# Altium PCB Kasli-DIOT.PCBDOC (part 9 of 23)
Units mm, origin at the board's own origin, x right, y up, seen from the top; angles counter-clockwise.
Board outline 222.9 x 100 mm, 10 copper layers (TopLayer, Layer 2, Layer 3, Layer 4, Layer 5, Layer 6, Layer 7, layer 8, Layer 9, BottomLayer), stack 1.564 mm thick; 977 components, 900 nets, 4676 pads, 2725 vias.
Unrouted connection lines stored in the file: 17.
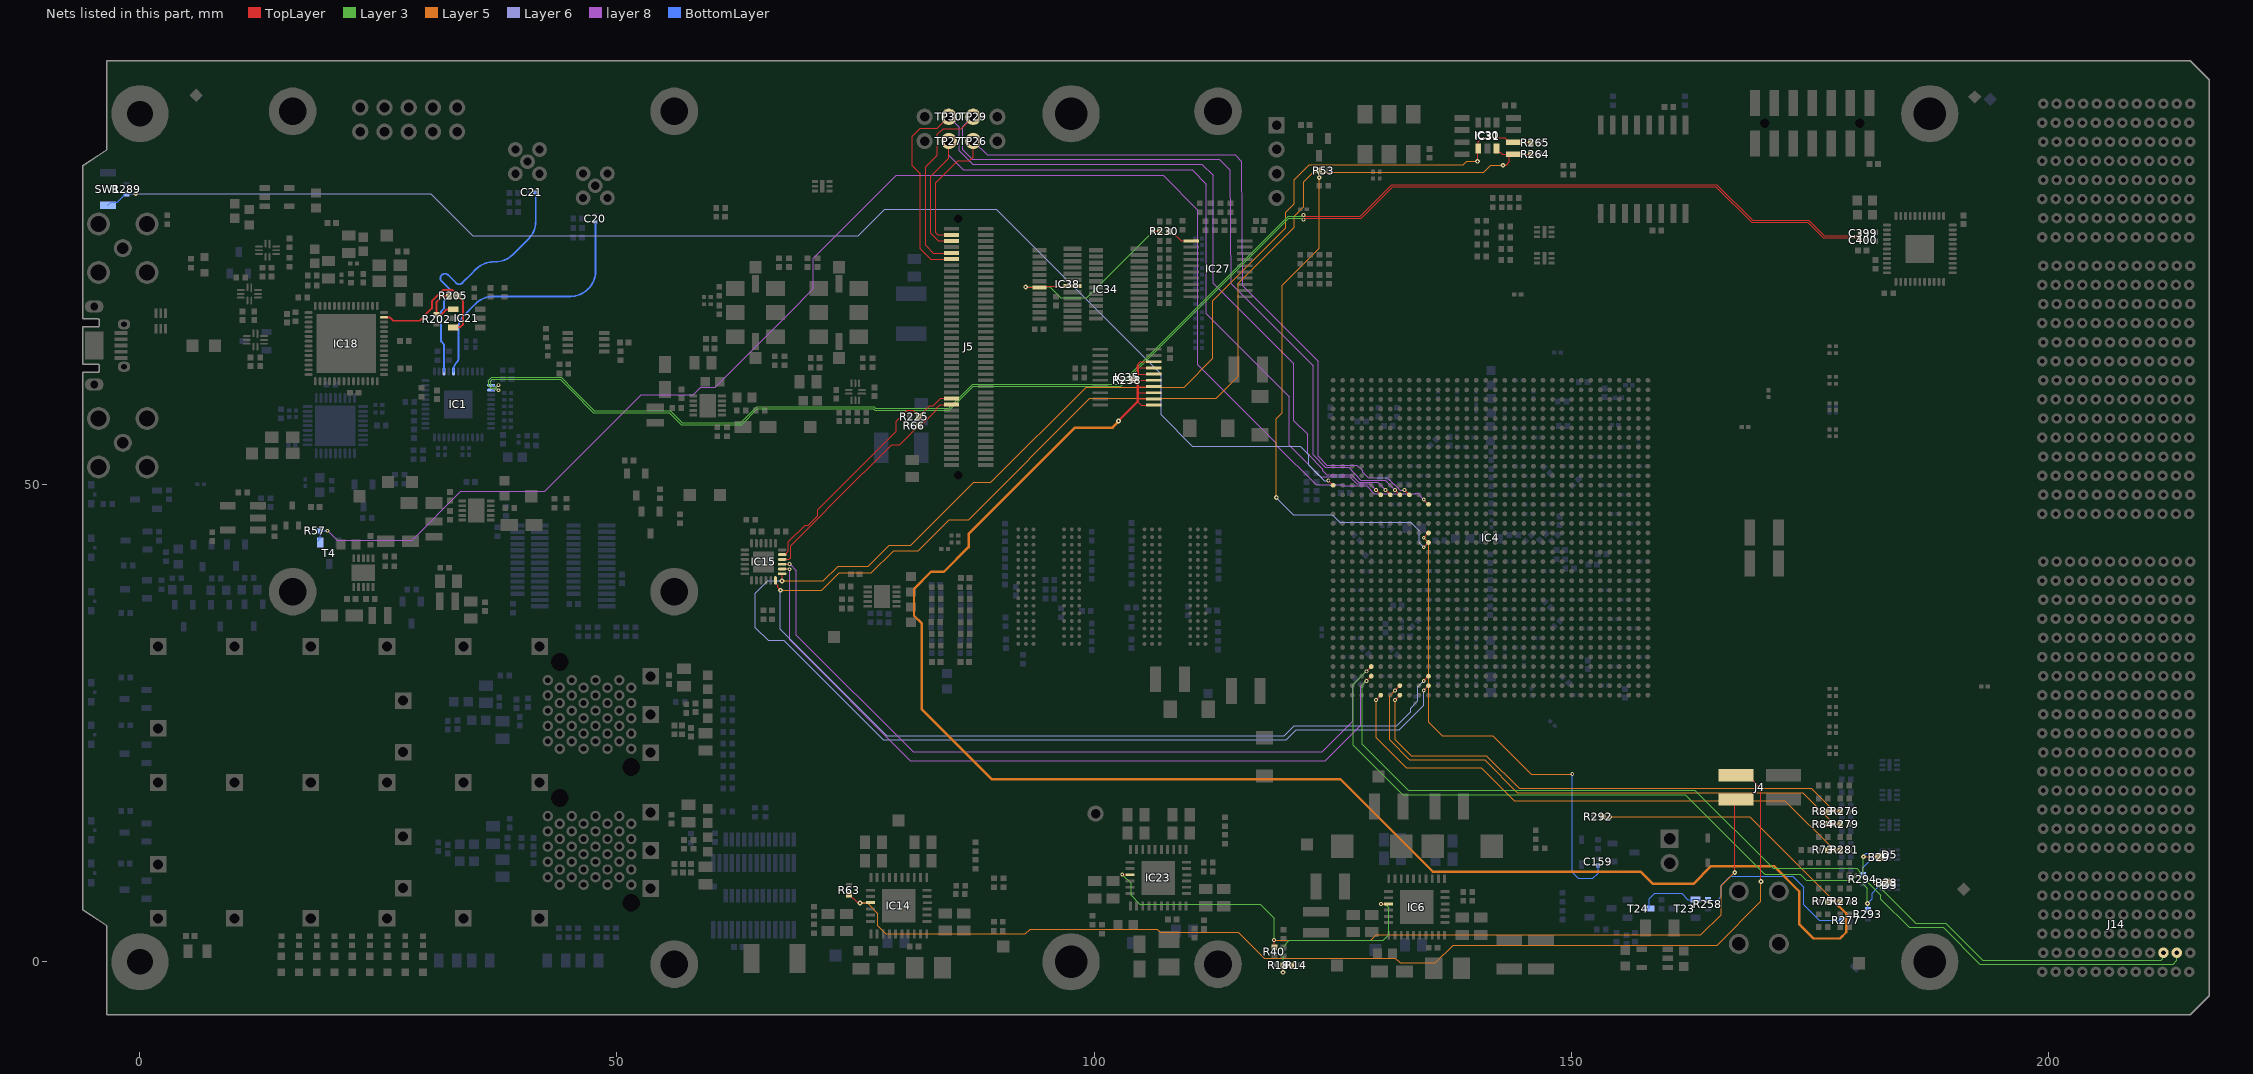
[diagram p15: the nets of this part, all layers, seen from the top]

## Via types
v1: diameter 0.4, hole 0.2, TopLayer to BottomLayer, tented both sides, 1723 vias
v2: diameter 0.5, hole 0.2, TopLayer to BottomLayer, tented both sides, 524 vias
v3: diameter 0.6, hole 0.3, TopLayer to BottomLayer, tented both sides, 172 vias
v4: diameter 0.6, hole 0.3, TopLayer to BottomLayer, 113 vias
v5: diameter 0.5, hole 0.2, TopLayer to BottomLayer, 107 vias
v6: diameter 0.4, hole 0.2, TopLayer to BottomLayer, 67 vias
v7: diameter 0.5, hole 0.25, TopLayer to BottomLayer, tented both sides, 12 vias
v8: diameter 0.8, hole 0.5, TopLayer to BottomLayer, tented both sides, 7 vias

## Nets (pads, with @x,y where several pads share a name; then routed paths per layer and width w, separated by ;. In a path a pad name is that pad's centre, name@x,y a point inside that pad or via, vN(x,y) a via of type N, cw(c..) or ccw(c..) an arc to the next point about the centre after c; other vN are vias at no path point) (continued)
Default_flash: IC4.M1 R289.1 SW1.1 | length 146.9
  TopLayer w0.095: v1(124.561,50.45) IC4.M1@125.061,49.95
  Layer 6 w0.127: v5(-0.449,80.53) -0.447,80.531 30.455,80.531 34.876,76.11 75.301,76.11 78.065,78.875 89.736,78.875 107.025,61.586 107.025,57.361 110.319,54.067 121.632,54.067 122.524,53.175 122.524,52.062 124.136,50.45 v1(124.561,50.45)
  BottomLayer w0.127: SW1.1@-3.364,79.3 -3.027,79.637 -2.373,79.637 -1.706,80.304 -1.646,80.304 -1.639,80.311 R289.1@-1.639,80.53 ; R289.1@-1.4,80.53 v5(-0.449,80.53)
DI: IC18.55 IC21.3 R205.2 | length 14.3
  TopLayer w0.2: IC18.55@25.576,67.558 26.186,67.558 26.544,67.2 29.311,67.2 30.592,68.481 30.592,69.231 31.791,70.43 32.718,70.43 33.331,69.817 R205.2@33.331,69.797 33.331,69.777 33.839,69.269 33.839,66.788 33.594,66.543 32.904,66.543 IC21.3@32.861,66.5
DIOT_BUS_CTRL.PRST_N: IC4.AP6 R73.1 R281.1 | length 58.9
  TopLayer w0.127: v1(129.561,27.45) IC4.AP6@130.061,27.95 ; R73.1@176.926,11.731 v2(177.581,11.731) R281.1@178.236,11.731
  Layer 5 w0.127: v1(129.561,27.45) 129.561,23.481 132.705,20.337 140.58,20.337 144.027,16.89 172.422,16.89 v2(177.581,11.731)
DIOT_BUS_CTRL.PS_ON_N: R258.1 R277.1 T23.1 T24.3 | length 26.4
  BottomLayer w0.127: T24.3@158.219,5.575 158.219,6.597 158.796,7.175 161.611,7.175 162.261,6.525 T23.1@163.061,6.525 164.294,6.525 R258.1@164.341,6.478 165.389,6.478 165.773,6.862 165.773,8.034 166.7,8.962 173.246,8.962 174.379,7.828 174.379,6.006 176.035,4.35 R277.1@178.391,4.35
DIOT_BUS_CTRL.PWR_FAIL_N: IC4.AN8 R84.1 R279.1 | length 57.7
  TopLayer w0.127: v1(131.561,28.45) IC4.AN8@132.061,28.95 ; R84.1@176.926,14.428 v2(177.581,14.428) R279.1@178.236,14.428
  Layer 5 w0.127: v1(131.561,28.45) 130.986,27.875 130.986,24.95 130.986,23.263 133.058,21.191 140.933,21.191 144.38,17.744 174.265,17.744 v2(177.581,14.428)
DIOT_BUS_CTRL.PWRBTN_N: IC4.AP8 R83.1 R276.1 | length 55.3
  TopLayer w0.127: v1(131.561,27.45) IC4.AP8@132.061,27.95 ; R83.1@176.926,15.776 176.93,15.772 v2(177.581,15.772) ; v2@177.581,15.776 R276.1@178.236,15.776
  Layer 5 w0.127: v1(131.561,27.45) 131.561,23.292 133.235,21.618 141.11,21.618 144.557,18.171 175.186,18.171 177.581,15.776 v2(177.581,15.772)
DIOT_BUS_CTRL.RST_N: IC35.11 IC35.12 IC35.13 IC35.14 IC35.15 IC35.16 IC35.17 IC35.18 R75.1 R238.2 R278.1 R292.2 | length 208.7
  TopLayer w0.127: 104.573,58.713 104.932,58.354 IC35.11@106.411,58.354 ; 104.573,58.938 104.64,59.004 IC35.12@106.411,59.004 ; 104.573,59.677 104.597,59.654 IC35.13@106.411,59.654 ; 104.573,60.304 IC35.14@106.411,60.304 ; 104.573,60.965 104.585,60.954 IC35.15@106.411,60.954 ; 104.573,61.683 104.653,61.604 IC35.16@106.411,61.604 ; 104.573,62.254 IC35.17@106.411,62.254 ; 104.573,62.445 104.573,62.622 104.855,62.904 IC35.18@106.411,62.904 ; R292.2@153.302,15.206 153.325,15.182 v2(154.061,15.182) ; R75.1@176.926,6.338 v2(177.581,6.338) R278.1@178.236,6.338
  TopLayer w0.254: v2(102.573,56.691) 102.573,56.712 104.573,58.713 104.573,58.938 104.573,59.677 104.573,60.304 104.573,60.965 ; R238.2@103.978,60.965 104.573,60.965 ; 104.573,62.445 104.573,62.254 104.573,61.683 104.573,60.965
  Layer 5 w0.127: v2@154.065,15.186 168.733,15.186 v2(177.581,6.338)
  Layer 5 w0.254: v2(102.573,56.691) 102.573,56.624 102.167,56.218 102.167,56.212 101.954,56 98.011,56 86.855,44.844 86.855,43.469 84.27,40.884 82.925,40.884 81.134,39.093 81.134,36.277 81.961,35.45 81.961,26.45 89.261,19.15 125.811,19.15 135.511,9.45 157.302,9.45 158.582,8.17 162.82,8.17 164.684,10.034 171.278,10.034 173.909,7.403 173.909,3.947 175.411,2.444 178.194,2.444 178.85,3.1 178.85,5.069 v2(177.581,6.338)
DIOT_CLK_IN_0.CLK_N: C400.1 IC1.35 | length 160.8
  TopLayer w0.095: v6(121.961,77.789) 122.1,77.928 127.989,77.928 131.315,81.254 165.195,81.254 168.95,77.5 174.825,77.5 176.435,75.89 179.688,75.89 179.689,75.889 180.053,75.889 180.109,75.833 180.109,75.803 180.261,75.65 C400.1@180.286,75.65
  Layer 3 w0.075: v1(37.586,60.441) 37.542,60.441 37.38,60.279 36.961,60.279 36.749,60.491 36.749,60.863 36.936,61.05 44.05,61.05 45.284,59.816 47.527,57.573 55.477,57.573 56.691,56.359 56.75,56.3 63.061,56.3 64.723,57.963 76.872,57.963 77.011,57.823 84.845,57.823 87.362,60.34 102.826,60.34 120.424,77.938 121.755,77.938 121.904,77.789 v6(121.961,77.789)
  BottomLayer w0.095: IC1.35@36.811,60.428 37.105,60.428 37.244,60.289 37.378,60.289 37.53,60.441 v1(37.586,60.441)
DIOT_CLK_IN_0.CLK_P: C399.1 IC1.36 | length 161.4
  TopLayer w0.095: v6(121.961,78.289) 122.1,78.15 127.897,78.15 131.223,81.476 165.287,81.476 169.042,77.722 174.917,77.722 176.527,76.112 179.78,76.112 179.781,76.111 180.053,76.111 180.109,76.167 180.109,76.198 180.261,76.35 C399.1@180.286,76.35
  Layer 3 w0.075: v1(37.586,59.915) 37.542,59.915 37.38,60.077 36.877,60.077 36.547,60.407 36.547,60.947 36.852,61.252 44.134,61.252 45.486,59.9 47.611,57.775 55.561,57.775 56.193,57.143 56.834,56.502 62.977,56.502 64.64,58.165 76.955,58.165 77.095,58.025 84.761,58.025 87.278,60.542 102.742,60.542 120.34,78.14 121.755,78.14 121.904,78.289 v6(121.961,78.289)
  BottomLayer w0.095: IC1.36@36.811,59.928 37.105,59.928 37.244,60.067 37.378,60.067 37.53,59.915 v1(37.586,59.915)
DIOT_I2C.SCL: B29.1 D5.5 IC4.AL5 IC15.15 J14.B2 R294.1 | length 194.7
  TopLayer w0.1: IC15.15@67.311,41.679 68.058,41.679 v1(68.085,41.706) ; v2(180.654,11.011) 182.285,11.011 B29.1@182.321,10.975
  TopLayer w0.127: v1(128.561,30.45) IC4.AL5@129.061,30.95
  Layer 3 w0.1: v1(128.561,30.45) 127.184,29.073 127.184,22.7 132.359,17.525 161.961,17.525 170.312,9.174 174.013,9.174 174.642,8.545 179.403,8.545 v1(179.892,9.034) ; v2(180.654,11.011) 180.654,8.807 182.461,7 182.461,6.575 185.439,3.598 189.005,3.598 192.849,-0.246 213.111,-0.246 213.5,0.143 J14.B2@213.5,0.95
  layer 8 w0.1: v1(68.085,41.706) 68.786,41.006 68.786,34.25 81.038,21.998 123.922,21.998 127.126,25.202 127.126,29.015 v1(128.561,30.45)
  BottomLayer w0.1: R294.1@180.388,9.103 R294.1@180.586,9.103
  BottomLayer w0.125: v1(179.892,9.034) 179.894,9.032 180.339,9.032 180.388,9.081 R294.1@180.388,9.103 ; R294.1@180.586,9.103 180.586,9.861 181.775,11.05 182.302,11.05 D5.5@182.461,11.209 ; v2(180.654,11.011) 180.654,11.103 180.946,11.396 182.26,11.396 182.36,11.296 182.374,11.296 D5.5@182.461,11.209 ; D5.5@182.461,11.195 D5.5@182.461,11.209
DIOT_I2C.SDA: B28.1 D3.5 IC4.AM5 IC15.14 J14.C2 R293.1 | length 188
  TopLayer w0.1: IC15.14@67.311,41.179 68.057,41.179 v1(68.085,41.15)
  TopLayer w0.125: v2(181.914,8.276) 183.081,8.276 B28.1@183.148,8.343
  TopLayer w0.127: v1(128.561,29.45) IC4.AM5@129.061,29.95
  Layer 3 w0.1: v1(128.561,29.45) 128.12,29.009 128.12,22.816 132.936,18 162.986,18 171.186,9.8 179.95,9.8 180.343,9.407 180.343,8.448 181.075,7.716 v2(181.075,6.125) ; 189.258,4.052 193.16,0.15 211.868,0.15 212.026,0.309 212.026,0.877 J14.C2@212.1,0.95
  Layer 3 w0.125: v2(181.914,8.276) 186.138,4.052 189.258,4.052
  layer 8 w0.1: v1(68.085,41.15) 68.085,33.763 80.761,21.087 124.258,21.087 127.981,24.811 127.981,28.87 v1(128.561,29.45)
  BottomLayer w0.125: v2(181.075,6.125) 181.558,6.608 181.558,7.187 182.333,7.963 182.539,7.963 D3.5@182.626,8.05 ; R293.1@181.111,5.459 v2@181.111,6.107 ; v2(181.914,8.276) 181.953,8.237 182.26,8.237 182.36,8.137 D3.5@182.374,8.137
DIR: IC27.1 R230.2 | length 2.6
  TopLayer w0.127: R230.2@107.853,76.57 107.995,76.429 108.259,76.429 109.128,75.561 IC27.1@110.047,75.561
DIRb: IC34.7 IC38.19 R230.1 | length 22.4
  TopLayer w0.127: v2(92.834,70.734) 92.856,70.713 94.27,70.713 IC38.19@94.297,70.686 94.41,70.798 97.71,70.798 IC34.7@97.747,70.836 ; v2(106.216,76.57) R230.1@106.913,76.57
  Layer 3 w0.127: v2(92.834,70.734) 95.381,70.734 96.512,69.602 99.248,69.602 v2(106.216,76.57)
DO: IC21.1 R202.1 R205.1 | length 4.9
  TopLayer w0.2: R205.1@32.391,69.797 31.695,69.797 31.086,69.188 R202.1@31.086,67.845 31.602,67.845 32.128,68.371 32.832,68.371 IC21.1@32.861,68.4
EEM_CLK_OUT0: C20.1 IC1.27 | length 27.4
  BottomLayer w0.19: IC1.27@32.861,61.878 32.861,62.005 cw(c34.056,62.005) 33.211,62.85 ccw(c32.789,63.272) 33.386,63.272 33.386,66.468 cw(c35.093,66.468) 33.885,67.674 ; 33.886,67.675 35.217,69.006 cw(c37.013,67.21) 37.013,69.75 45.134,69.75 ccw(c45.134,72.29) 46.93,70.494 47.017,70.581 ccw(c45.221,72.377) 47.761,72.377 47.761,77.525 C20.1@47.736,77.55
EEM_CLK_OUT1: C21.1 IC1.25 | length 27.5
  BottomLayer w0.19: IC1.25@31.861,61.878 31.861,64.732 31.566,65.027 31.566,68.188 31.861,68.483 31.861,69.225 32.386,69.75 32.453,69.817 ccw(c32.117,70.154) 32.453,70.49 31.624,71.319 cw(c31.961,71.656) 31.624,71.992 cw(c31.961,71.656) 32.298,71.992 33.126,71.164 ccw(c33.463,71.5) 33.8,71.164 34.736,72.1 35.267,72.631 cw(c37.063,70.835) 37.063,73.375 37.259,73.375 ccw(c37.259,75.915) 39.055,74.119 40.742,75.806 ccw(c38.946,77.602) 41.486,77.602 41.486,80.6 C21.1@41.436,80.65
EEPROM_SCL: IC4.AN11 IC15.13 IC30.1 IC31.6 R265.1 | length 191.5
  TopLayer w0.095: v2(67.288,39.925) 67.311,39.948 IC15.13@67.311,40.679
  TopLayer w0.125: v2(140.203,83.904) 140.203,85.192 IC30.1@140.286,85.275 140.286,85.95 140.697,86.361 143.04,86.361 143.486,85.915 IC31.6@143.961,85.915 145.726,85.915 R265.1@145.791,85.85
  TopLayer w0.127: v1(134.561,28.45) IC4.AN11@135.061,28.95
  Layer 5 w0.095: v2(67.288,39.925) 71.639,39.925 73.189,41.475 76.353,41.475 78.551,43.674 80.801,43.674 87.377,50.25 89.161,50.25 99.161,60.25 109.461,60.25 112.461,63.25 112.461,69.295 120.104,76.938 120.104,78.593 120.985,79.474 120.985,81.95 122.575,83.54 138.714,83.54 139.078,83.904 v2(140.203,83.904)
  Layer 6 w0.127: v2(67.288,39.925) 65.785,39.925 64.486,38.626 64.486,35.035 65.84,33.68 67.491,33.68 77.897,23.275 120.129,23.275 121.185,24.331 132.001,24.331 134.561,26.891 v1(134.561,28.45)
EEPROM_SDA: IC4.AM11 IC15.12 IC30.3 IC31.5 R264.1 | length 189
  TopLayer w0.095: IC15.12@66.611,39.979 66.611,39.679 66.827,39.463 66.827,39.259 v2(67.136,38.95)
  TopLayer w0.125: IC30.3@142.186,85.098 142.423,84.861 142.6,84.861 142.816,84.645 143.784,84.645 143.547,84.408 143.547,83.855 143.211,83.519 142.88,83.519 v2(142.861,83.5) ; IC31.5@143.961,84.645 145.786,84.645 R264.1@145.791,84.65
  TopLayer w0.127: v1(134.561,29.45) IC4.AM11@135.061,29.95
  Layer 5 w0.095: v2(67.136,38.95) 71.464,38.95 73.289,40.775 76.671,40.775 78.995,43.099 81.571,43.099 84.816,46.344 86.855,46.344 99.561,59.05 112.792,59.05 115.111,61.369 115.111,71.114 120.985,76.988 120.985,78.174 121.961,79.15 121.961,81.75 122.961,82.75 140.861,82.75 141.611,83.5 v2(142.861,83.5)
  Layer 6 w0.127: v2(67.136,38.95) 67.136,34.842 78.274,23.704 119.951,23.704 121.007,24.76 131.746,24.76 133.197,26.212 133.197,26.601 133.936,27.339 133.936,28.825 v1(134.561,29.45)
EN1: IC6.19 R14.1 R18.2 | length 20.5
  TopLayer w0.127: v2(119.812,-1.099) 119.812,-0.419 R18.2@119.856,-0.375 120.716,-0.375 R14.1@120.741,-0.35 ; v1(130.086,6.05) 130.103,6.067 IC6.19@130.861,6.067
  Layer 3 w0.127: v2(119.812,-1.099) 119.812,1.597 120.49,2.275 130.336,2.275 130.911,2.85 130.911,5.675 130.536,6.05 v1(130.086,6.05)
EN2: IC23.19 J4.3 R40.1 | length 83.2
  TopLayer w0.127: v6(102.961,9.15) 102.973,9.138 103.761,9.138 IC23.19@103.774,9.125 ; v6(118.875,2.277) 118.902,2.25 118.902,1.525 R40.1@118.915,1.512 ; v2(167.161,9.375) 167.161,16.873 J4.3@167.308,17.02
  Layer 3 w0.127: v6(102.961,9.15) 103.886,8.225 103.886,6.975 104.811,6.05 117.411,6.05 118.875,4.586 v6(118.875,2.277)
  Layer 5 w0.127: v6(118.875,2.277) 118.889,2.263 128.988,2.263 129.561,2.836 163.621,2.836 165.738,4.954 165.738,7.952 v2(167.161,9.375)
EN3: IC14.19 J4.1 R63.1 | length 118.5
  TopLayer w0.127: R63.1@74.336,7.055 74.356,7.055 75.165,6.246 75.39,6.246 v2(75.461,6.175) 75.474,6.188 76.561,6.188 IC14.19@76.573,6.2 ; J4.1@167.308,19.56 168.513,19.56 169.908,18.164 v2(169.908,8.414)
  Layer 5 w0.127: v2(75.461,6.175) 76.22,6.175 77.336,5.059 77.336,3.764 78.17,2.931 92.806,2.931 93.299,3.424 106.618,3.424 106.942,3.1 115.136,3.1 117.859,0.377 131.578,0.377 132.077,-0.123 135.788,-0.123 137.661,1.75 165.321,1.75 169.908,6.338 v2(169.908,8.414)
EXT_SCL: IC15.17 J5.58 R225.1 | length 26.6
  TopLayer w0.125: IC15.17@67.311,42.679 67.611,42.679 67.973,43.041 67.973,44.028 69.723,45.778 70.051,45.778 71.036,46.762 71.036,47.387 72.643,48.995 72.648,48.995 79.28,55.626 79.28,56.663 80.427,57.809 80.982,57.809 R225.1@81.631,57.16 ; R225.1@81.631,57.14 R225.1@81.631,57.16 ; J5.58@85.061,59.053 83.912,59.053 83.16,58.3 82.791,58.3 81.878,57.388 81.858,57.388 R225.1@81.631,57.16
EXT_SDA: IC15.16 J5.60 R66.1 | length 25.4
  TopLayer w0.125: IC15.16@67.311,42.179 68.03,42.179 68.198,42.347 68.198,43.607 75.833,51.241 75.864,51.241 78.797,54.173 79.624,54.173 81.631,56.18 R66.1@81.631,56.2 81.631,56.22 81.858,56.447 82.108,56.447 83.47,57.809 83.47,58.01 83.877,58.418 J5.60@85.061,58.418
FAN_PWM: C159.2 IC4.U11 | length 51.9
  TopLayer w0.127: v1(134.561,44.45) IC4.U11@135.061,44.95
  Layer 5 w0.127: v1(134.561,44.45) 135.069,43.942 135.069,25.092 136.486,23.675 141.811,23.675 145.811,19.675 v1(150.136,19.675)
  BottomLayer w0.127: v1(150.136,19.675) 150.136,9.396 150.782,8.75 152.294,8.75 152.836,9.292 C159.2@152.836,10.125
FPGA_DONE: IC4.P11 R57.1 T4.1 | length 159.5
  TopLayer w0.095: v1(134.561,48.45) IC4.P11@135.061,47.95
  layer 8 w0.095: 126.135,49.895 128.607,49.895 129.034,49.469 129.034,49.404 129.363,49.076 133.716,49.076 133.736,49.095 133.916,49.095 v1(134.561,48.45)
  layer 8 w0.125: v1(19.67,45.185) 20.656,44.199 28.53,44.199 33.631,49.3 42.411,49.3 52.561,59.45 58.011,59.45 58.786,60.225 60.317,60.225 68.052,67.96 68.052,67.991 70.586,70.525 70.586,73.731 79.283,82.428 107.258,82.428 110.886,78.8 110.886,62.61 119.124,54.372 119.124,54.166 123.297,49.994 126.036,49.994 126.135,49.895
  BottomLayer w0.125: T4.1@18.656,44.093 18.728,44.164 18.728,44.341 18.905,44.341 18.905,45.114 18.976,45.185 v1(19.67,45.185)
FPGA_INIT_B: IC4.V11 R53.2 | length 55.2
  TopLayer w0.095: v1(134.561,43.45) IC4.V11@135.061,43.95
  TopLayer w0.127: v5(123.611,82.225) 123.611,82.915 R53.2@123.621,82.925
  Layer 5 w0.127: v5(119.111,48.675) 119.111,56.95 119.736,57.575 119.736,70.9 123.611,74.775 v5(123.611,82.225)
  Layer 6 w0.1: v5(119.111,48.675) 119.111,48.645 120.904,46.852 124.963,46.852 125.74,46.074 133.187,46.074 134.086,45.175 134.086,43.925 v1(134.561,43.45)
FPGA_TP.FPGA_TESTPOINT0: IC4.N9 J5.4 TP26.1 | length 88.3
  TopLayer w0.095: v1(132.561,49.45) IC4.N9@133.061,48.95
  TopLayer w0.127: J5.4@85.061,76.198 83.635,76.198 83.411,76.421 83.411,81.68 85.706,83.975 86.948,83.975 87.326,84.353 TP26.1@87.326,86.035
  layer 8 w0.095: TP26.1@87.326,86.035 88.784,84.577 114.784,84.577 115.457,83.904 ; 115.457,83.905 115.558,70.904 ; 115.558,70.903 115.586,70.875 123.511,62.95 123.511,52.97 124.406,52.076 127.561,52.076 128.186,51.45 128.186,51.295 128.731,50.75 130.731,50.75 131.406,50.076 131.465,50.076 132.091,49.45 v1(132.561,49.45)
FPGA_TP.FPGA_TESTPOINT1: IC4.N6 J5.6 TP27.1 | length 85.5
  TopLayer w0.095: v1(129.561,49.45) IC4.N6@130.061,48.95
  TopLayer w0.127: TP27.1@84.786,86.035 84.786,84.249 82.879,82.342 82.879,76.348 83.664,75.563 J5.6@85.061,75.563
  layer 8 w0.095: TP27.1@84.786,86.035 84.786,84.55 86.311,83.025 110.286,83.025 111.786,81.525 111.786,67.925 120.461,59.25 120.461,54.12 123.757,50.825 126.812,50.825 127.546,50.09 128.921,50.09 v1(129.561,49.45)
FPGA_TP.FPGA_TESTPOINT2: IC4.N8 J5.10 TP29.1 | length 96.7
  TopLayer w0.095: v1(131.561,49.45) IC4.N8@132.061,48.95
  TopLayer w0.127: J5.10@85.061,74.293 83.161,74.293 82.367,75.087 82.367,83.331 83.561,84.524 83.561,86.725 84.181,87.345 86.096,87.345 TP29.1@87.326,88.575
  layer 8 w0.095: TP29.1@87.326,88.575 86.268,87.517 86.268,85.143 87.261,84.15 113.105,84.15 114.23,83.025 ; 114.229,83.027 114.342,71.119 114.37,71.091 122.961,62.5 122.961,53.125 124.261,51.825 126.716,51.825 127.019,51.522 127.019,51.463 127.321,51.16 127.981,50.5 130.511,50.5 v1(131.561,49.45)
FPGA_TP.FPGA_TESTPOINT3: IC4.N7 J5.12 TP30.1 | length 96
  TopLayer w0.095: v1(130.561,49.45) IC4.N7@131.061,48.95
  TopLayer w0.127: TP30.1@84.786,88.575 83.561,87.35 81.761,87.35 80.961,86.55 80.961,83.442 81.786,82.617 81.786,74.75 82.879,73.658 J5.12@85.061,73.658
  layer 8 w0.095: TP30.1@84.786,88.575 85.886,87.475 85.886,85.025 87.286,83.625 111.289,83.625 112.486,82.428 112.486,71.15 120.961,62.675 120.961,56.7 122.386,55.275 122.386,53.255 123.999,51.642 123.999,51.483 124.406,51.076 126.985,51.076 127.776,50.285 129.726,50.285 v1(130.561,49.45)